# Altium PCB PCB1.PcbDoc
Units mm, origin at the board's own origin, x right, y up, seen from the top; angles counter-clockwise.
Board outline 85 x 53 mm, 2 copper layers (Top Layer, Bottom Layer); 3 components, 0 nets, 12 pads, 6 vias.
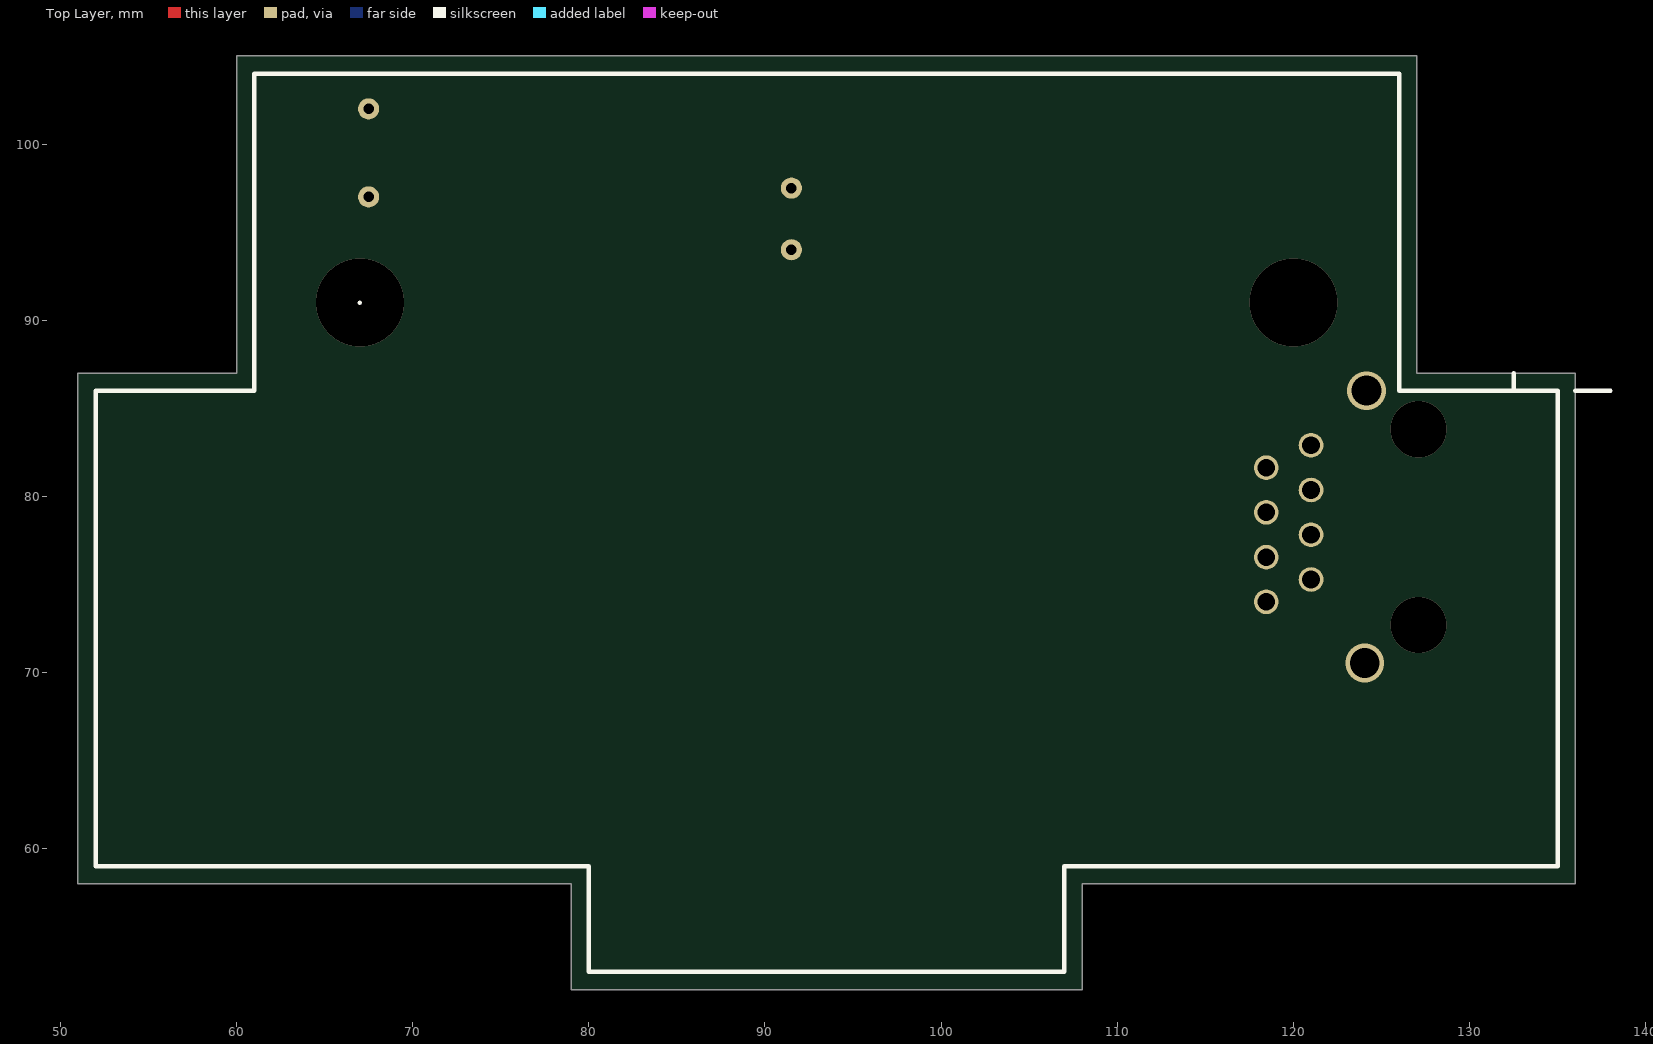
[diagram p0: Top Layer view]
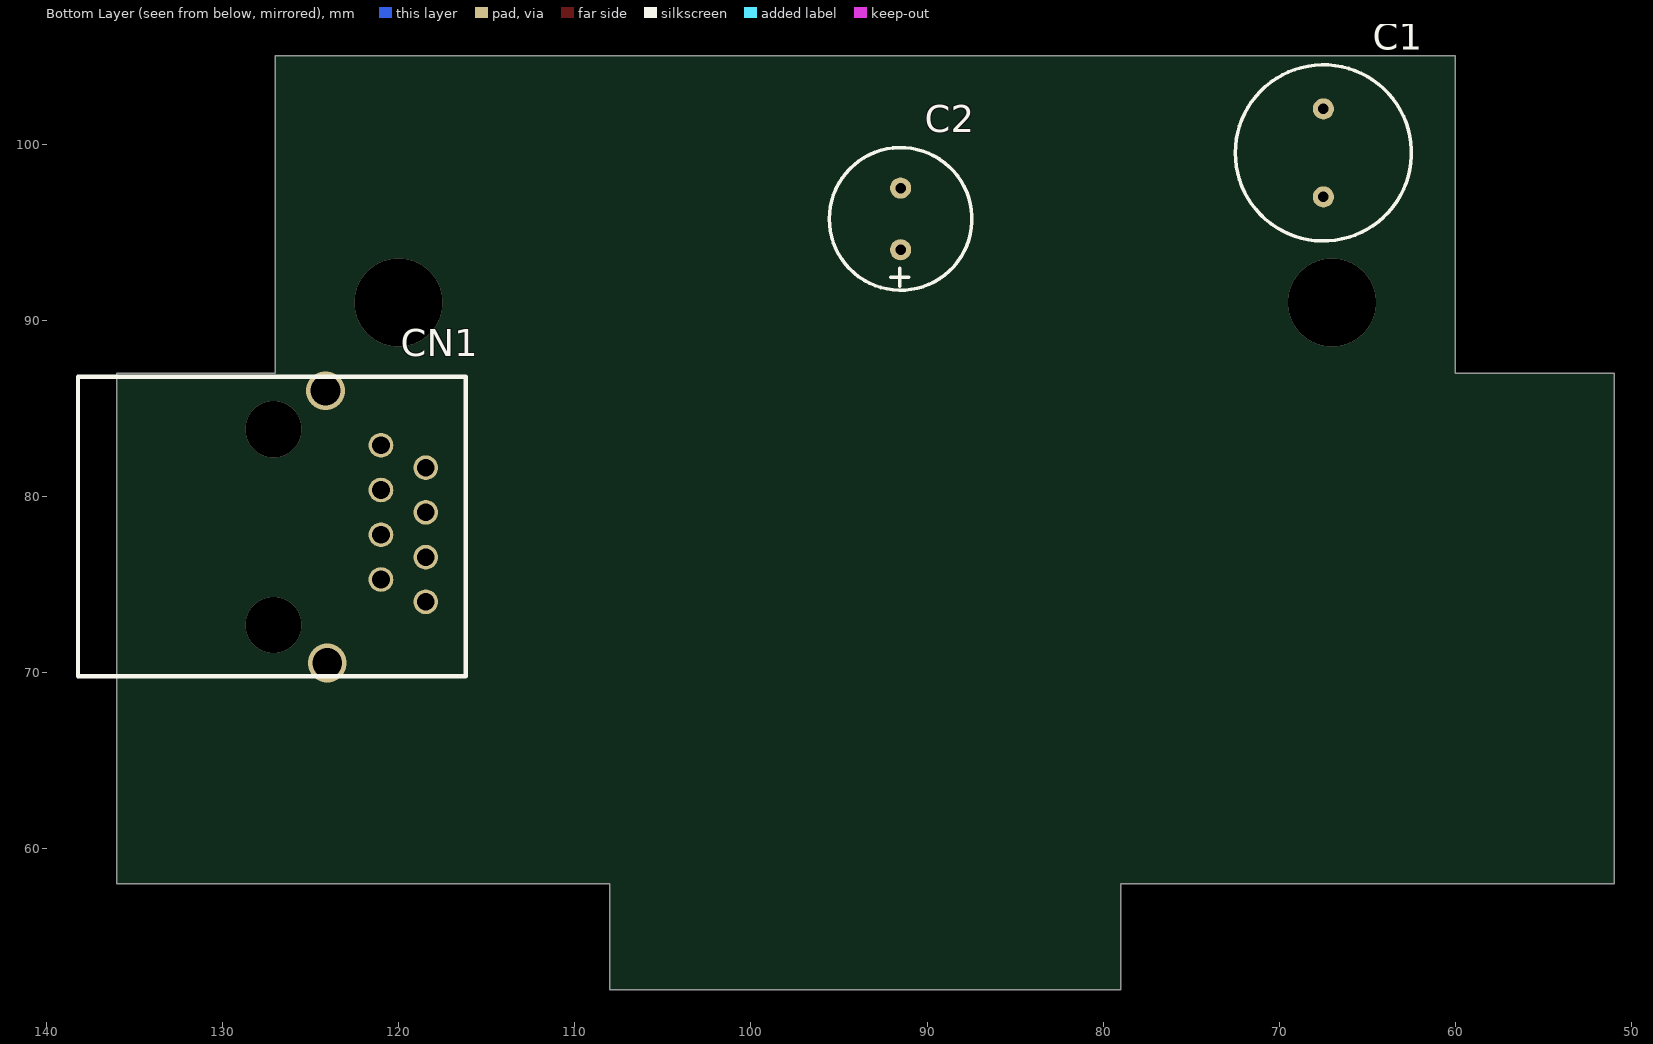
[diagram p1: Bottom Layer view, seen from below]

## Layer stack, top to bottom
Top Solder: solder mask 0.0102, Solder Resist, Dk 3.5
Top Layer: signal copper 0.0356
Dielectric 1: dielectric 0.32, FR-4, Dk 4.8
Bottom Layer: signal copper 0.0356
Bottom Solder: solder mask 0.0102, Solder Resist, Dk 3.5

## Board outline
51,58 51,87 60,87 60,105 127,105 127,87 136,87 136,58 108,58 108,52 79,52 79,58

## Design rules (kind name [scope] priority, off if disabled: settings)
Clearance [All] p1: gap=0.254 ignorepadtopadclearanceinfootprint=FALSE
PolygonConnect [All] p1: connectstyle=Relief reliefconductorwidth=0.254 reliefentries=4 polygonreliefangle="90 Angle" airgapwidth=0.254
RoutingVias [All] p1: holewidth=0.711 width=1.27 viastyle="Through Hole" minholewidth=0.711 minwidth=1.27 maxholewidth=0.711 maxwidth=1.27
SolderMaskExpansion [All] p1: expansion=0.102 istentingtop=FALSE
Width [All] p1: maxlimit=0.254 minlimit=0.254 preferedwidth=0.254
30 further rules are at their usual default settings.

## Components (designator, comment, footprint, x,y, rotation, side; value= is the part's Value field where it differs from the comment)
C1 "Comment" Cap10x17mm 67.5,97 r90 bottom
C2 "Comment" cap8x17mm 91.5,95.7 r90 bottom
CN1 "Comment" Rj45_Ethernet 129.5,78.5 r270 bottom

## Footprints (in the part's own frame and the unit in brackets; to place one, negate y for a bottom-side part, rotate by r counter-clockwise, add the part's x,y. Pads: shape width x height; smd on the part's side, far side on the other; paste and mask are expansions set on the pad)
cap8x17mm [mm]
  round 1.2 hole 0.6: 1(-1.7,0) 2(1.8,0)
  silkscreen extent -4,-4.05 4.1,4.05, body extent -3.96,-3.99 4.04,4.01, height 12.3
Cap10x17mm [mm]
  round 1.2 hole 0.6: 1(0,0) 2(5,0)
  silkscreen extent -2.5,-5 7.5,5, body extent -2.5,-5 7.5,5, height 17.2
Rj45_Ethernet [mm]
  round 1.4 hole 1: 1(-4.4,8.5) 2(-3.13,11.04) 3(-1.86,8.5) 4(-0.59,11.04) 5(0.68,8.5) 6(1.95,11.04) 7(3.22,8.5) 8(4.49,11.04)
  silkscreen extent -8.3,-8.7 8.7,13.3, body extent -7.8,-8.5 8.2,12.8, height 13

## Via types
v1: diameter 3.2, hole 3.2, Top Layer to Bottom Layer, 2 vias
v2: diameter 2.2, hole 1.7, Top Layer to Bottom Layer, 2 vias
v3: diameter 5, hole 5, Top Layer to Bottom Layer, 2 vias

## Nets (pads, with @x,y where several pads share a name; then routed paths per layer and width w, separated by ;. In a path a pad name is that pad's centre, name@x,y a point inside that pad or via, vN(x,y) a via of type N, cw(c..) or ccw(c..) an arc to the next point about the centre after c; other vN are vias at no path point)
pads on no net: C1.1 C1.2 C2.1 C2.2 CN1.1 CN1.2 CN1.3 CN1.4 CN1.5 CN1.6 CN1.7 CN1.8
copper on no net:
  other v1: 127.1,72.7 127.1,83.8
  other v2: 124.05,70.54 124.15,86
  other v3: 67,91 120,91

## Silkscreen, mask and mechanical layers (free items; w line width, h text height)
Top Overlay:
  lines w0.254: 132.5,86 132.5,87 ; 136,86 138,86 ; 52,59 80,59 80,53 107,53 107,59 135,59 135,86 126,86 126,104 61,104 61,86 52,86 52,59 ; 67,91 67,91
Mechanical 1:
  the board outline again, w0.254